# Altium PCB Acoustics Board.PcbDoc (part 1 of 2)
Units mil, origin at the board's own origin, x right, y up, seen from the top; angles counter-clockwise.
Board outline 4000 x 4000 mil, 4 copper layers (Top Layer, Middle 1 Layer, Middle 2 Layer, Bottom Layer), stack 53.912 mil thick; 112 components, 90 nets, 392 pads, 175 vias.
Unrouted connection lines stored in the file: 41.
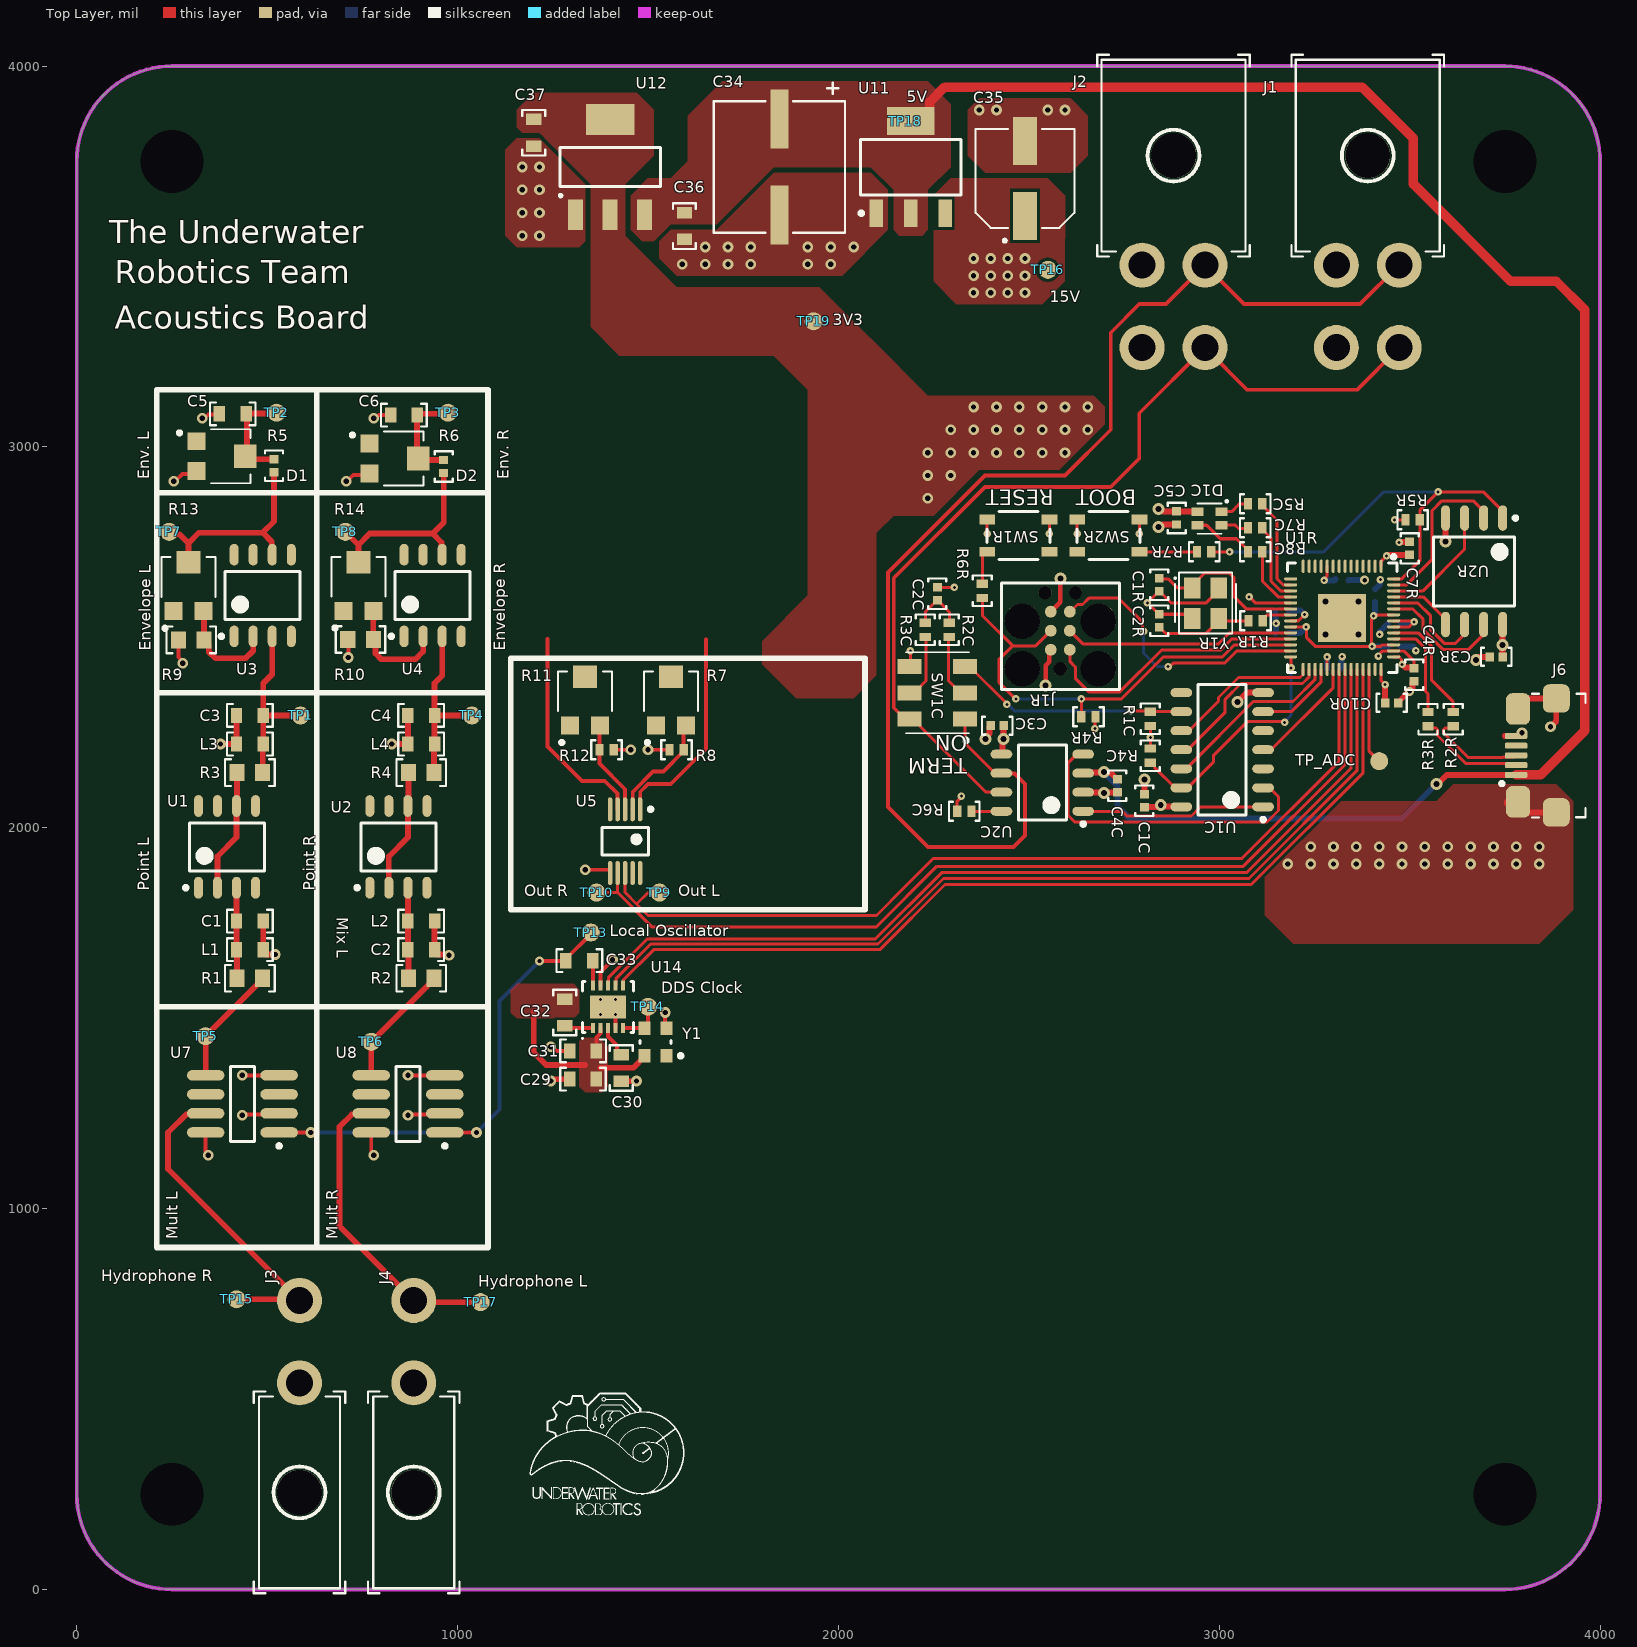
[diagram p0: Top Layer view]
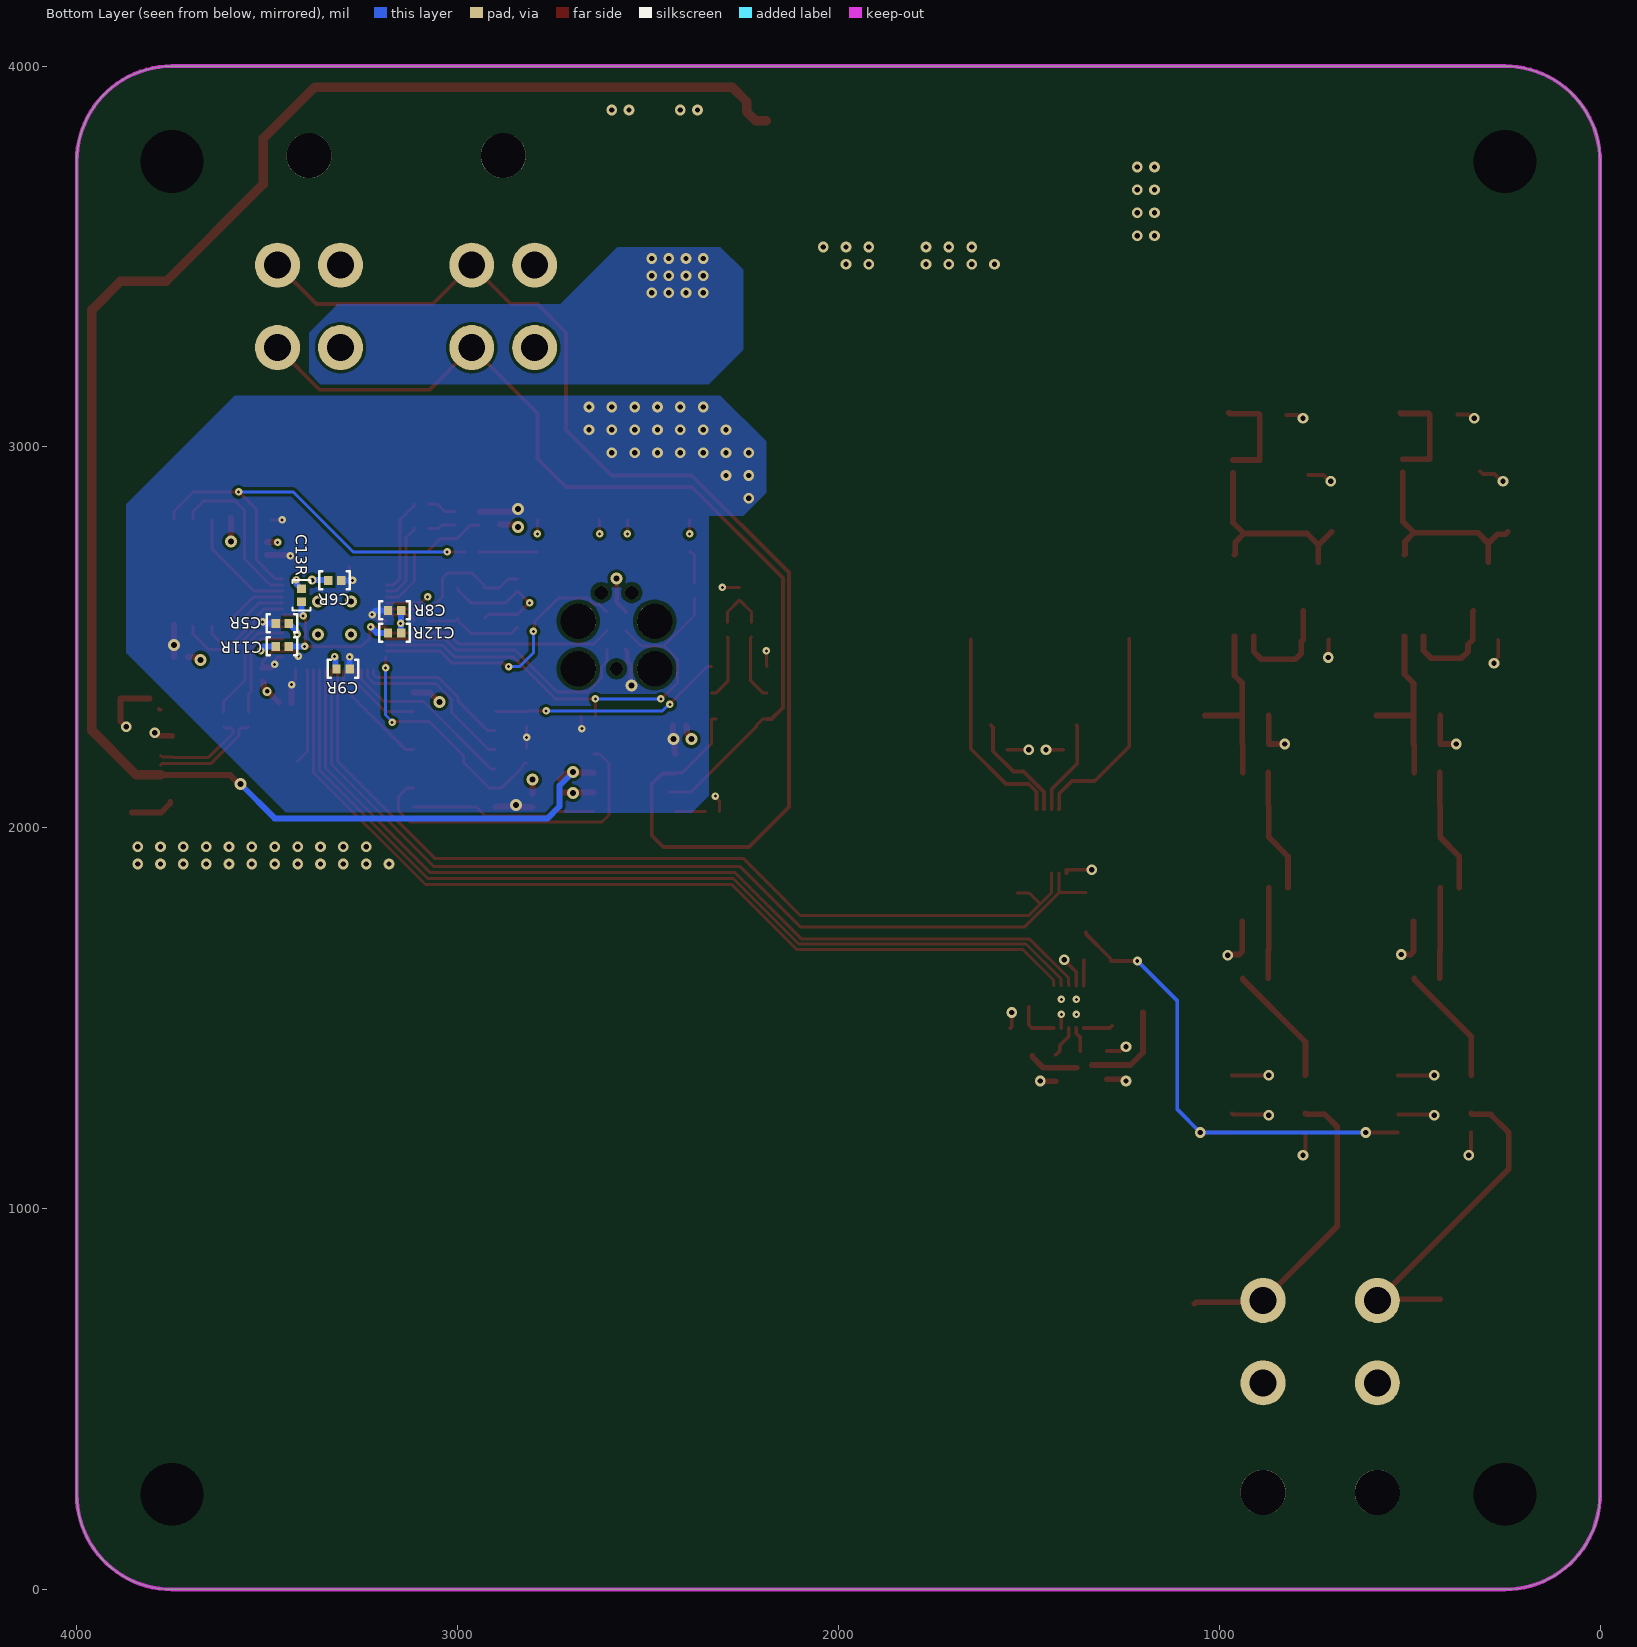
[diagram p1: Bottom Layer view, seen from below]
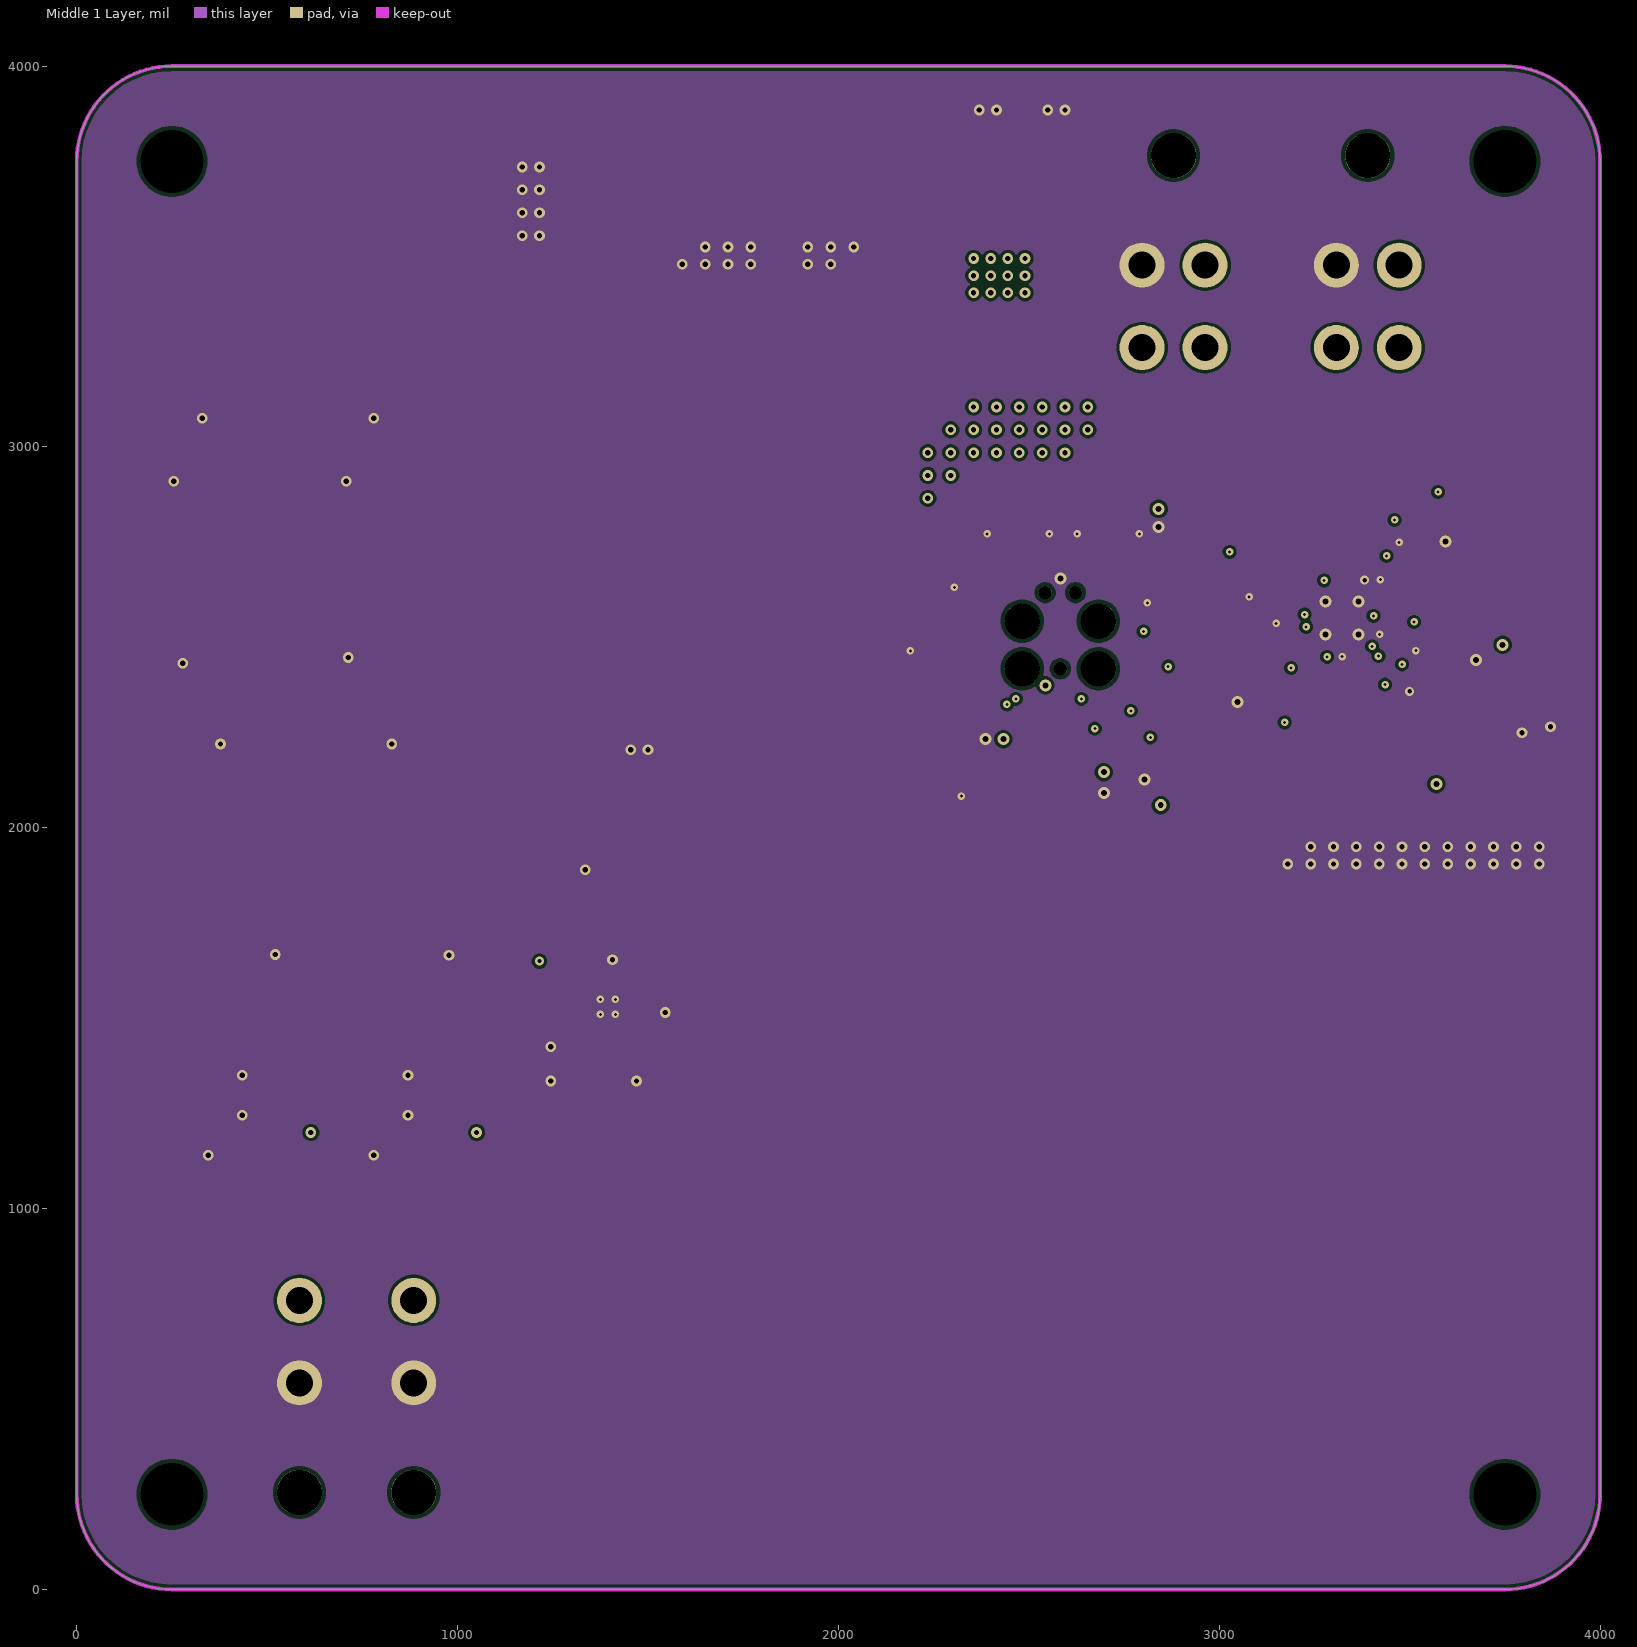
[diagram p2: Middle 1 Layer]
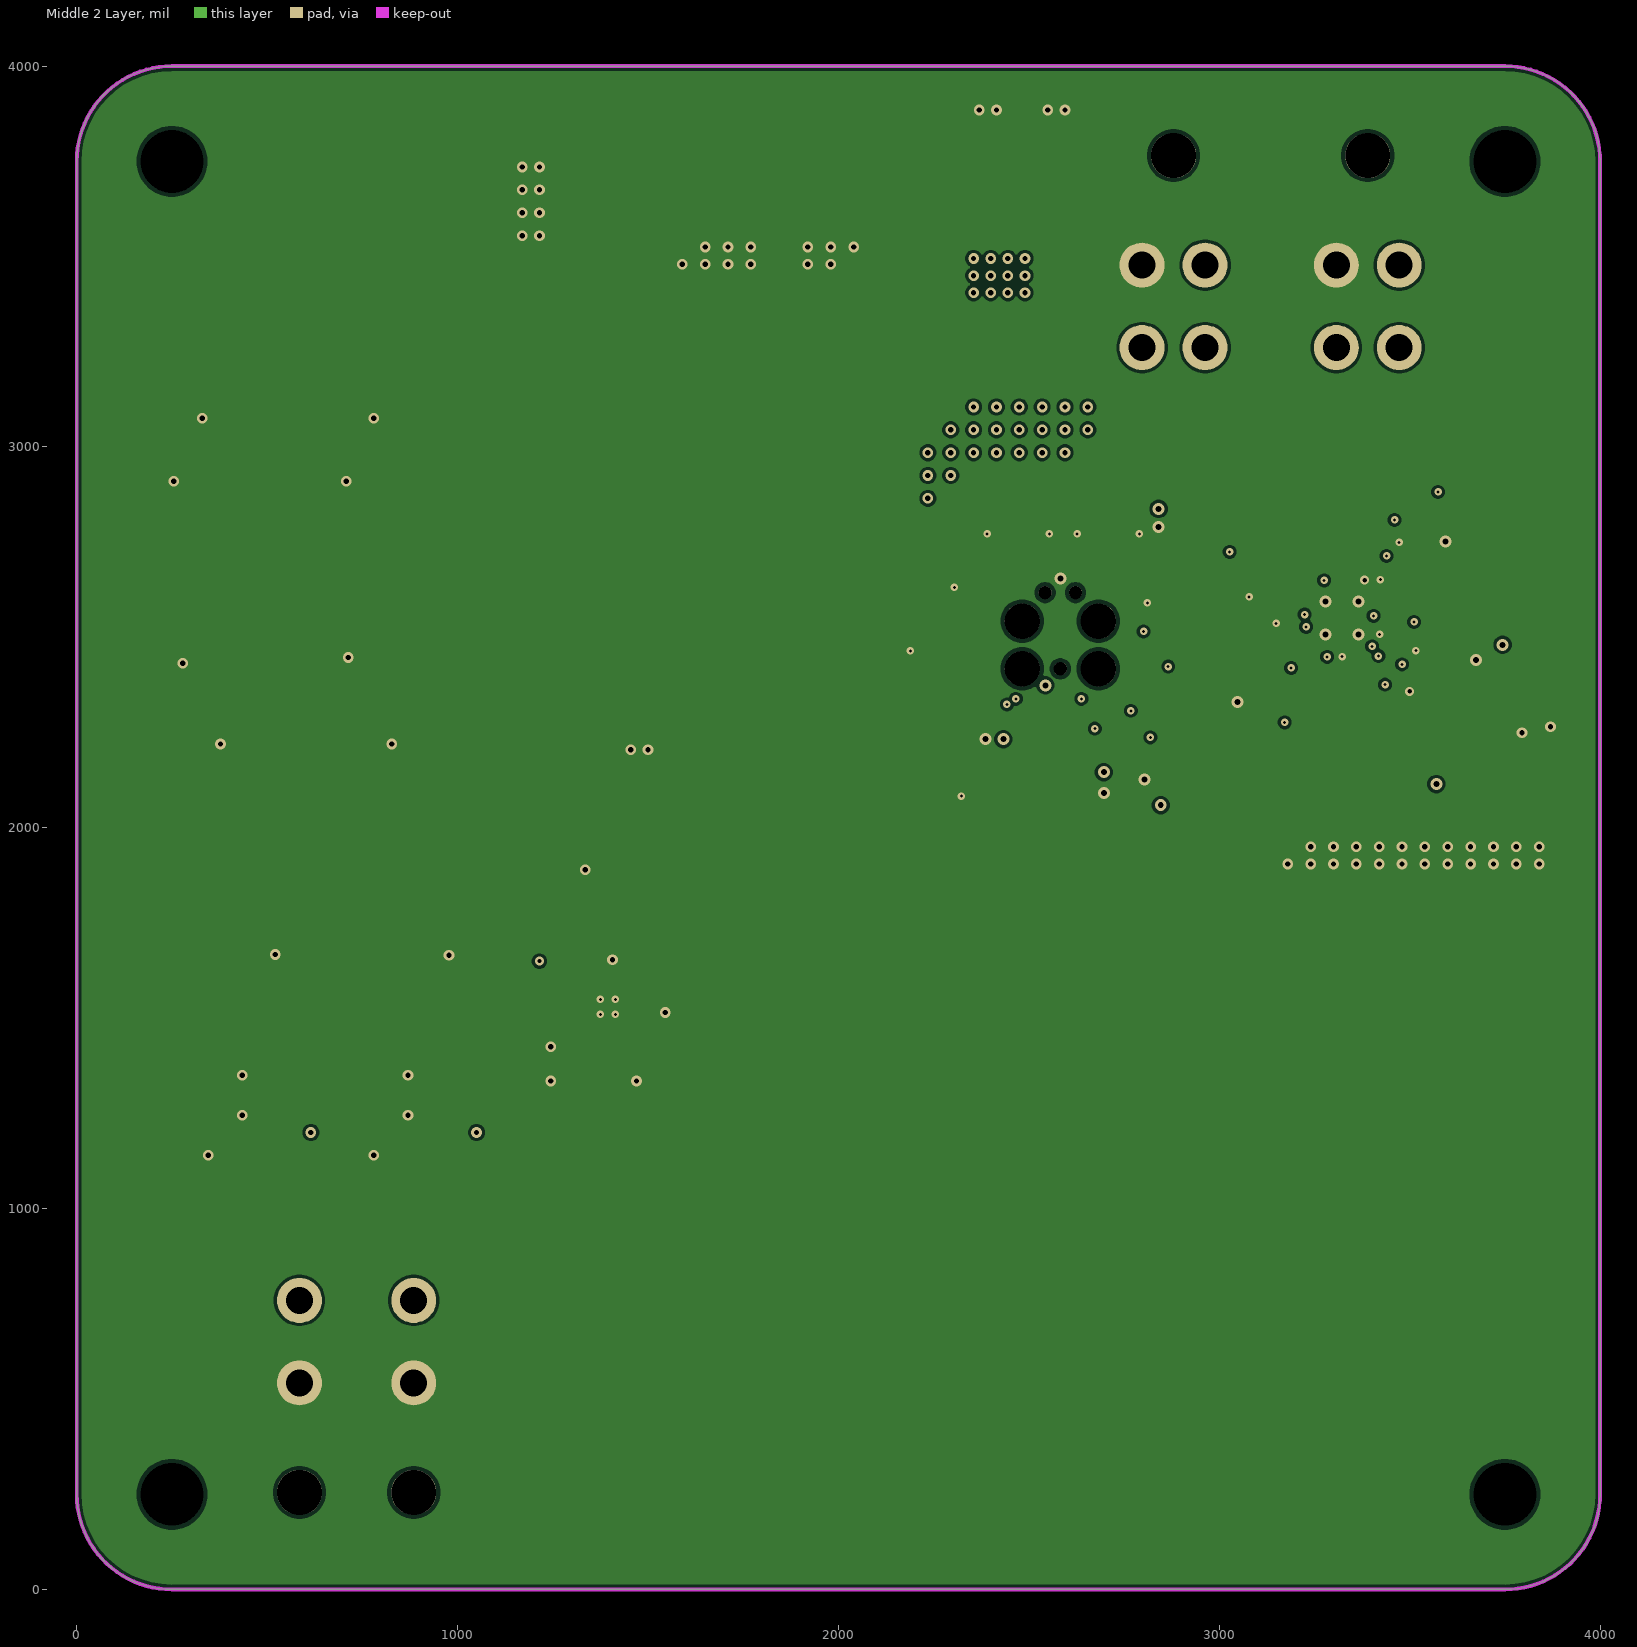
[diagram p3: Middle 2 Layer]
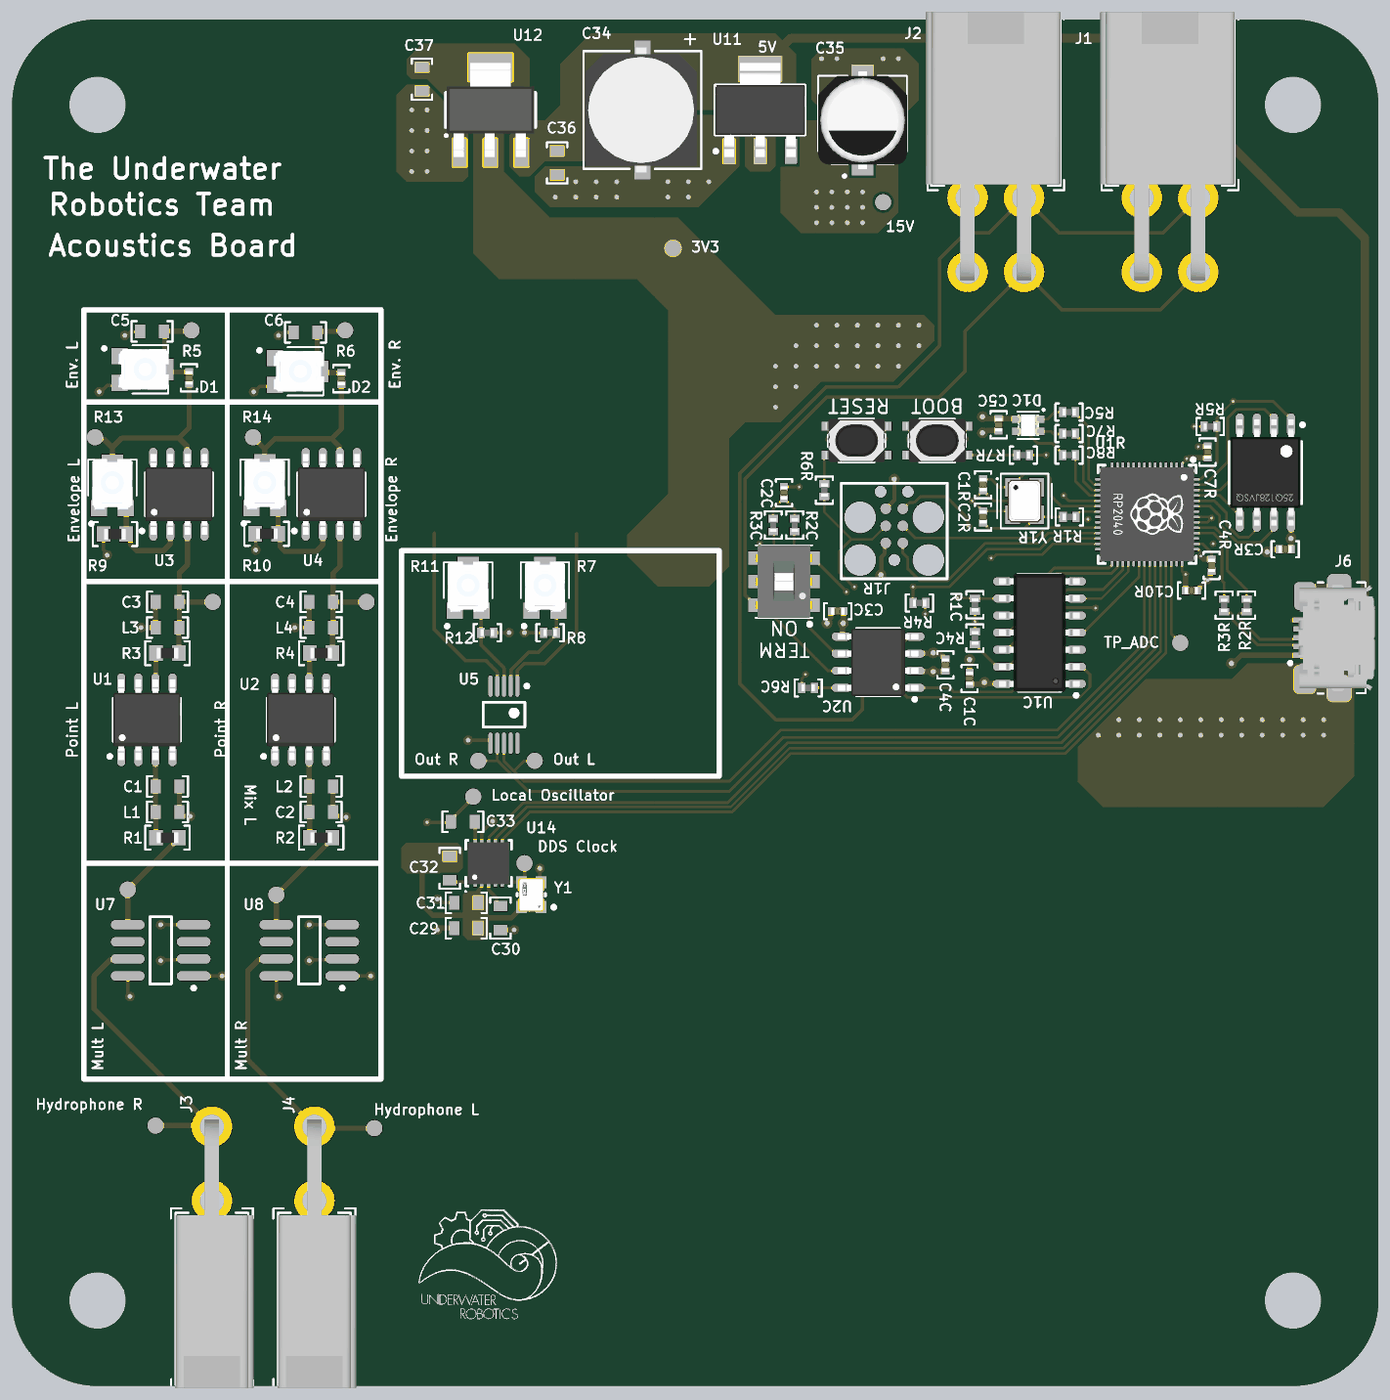
[diagram p5: 3D render of the assembled board from above, using the file's embedded part models]
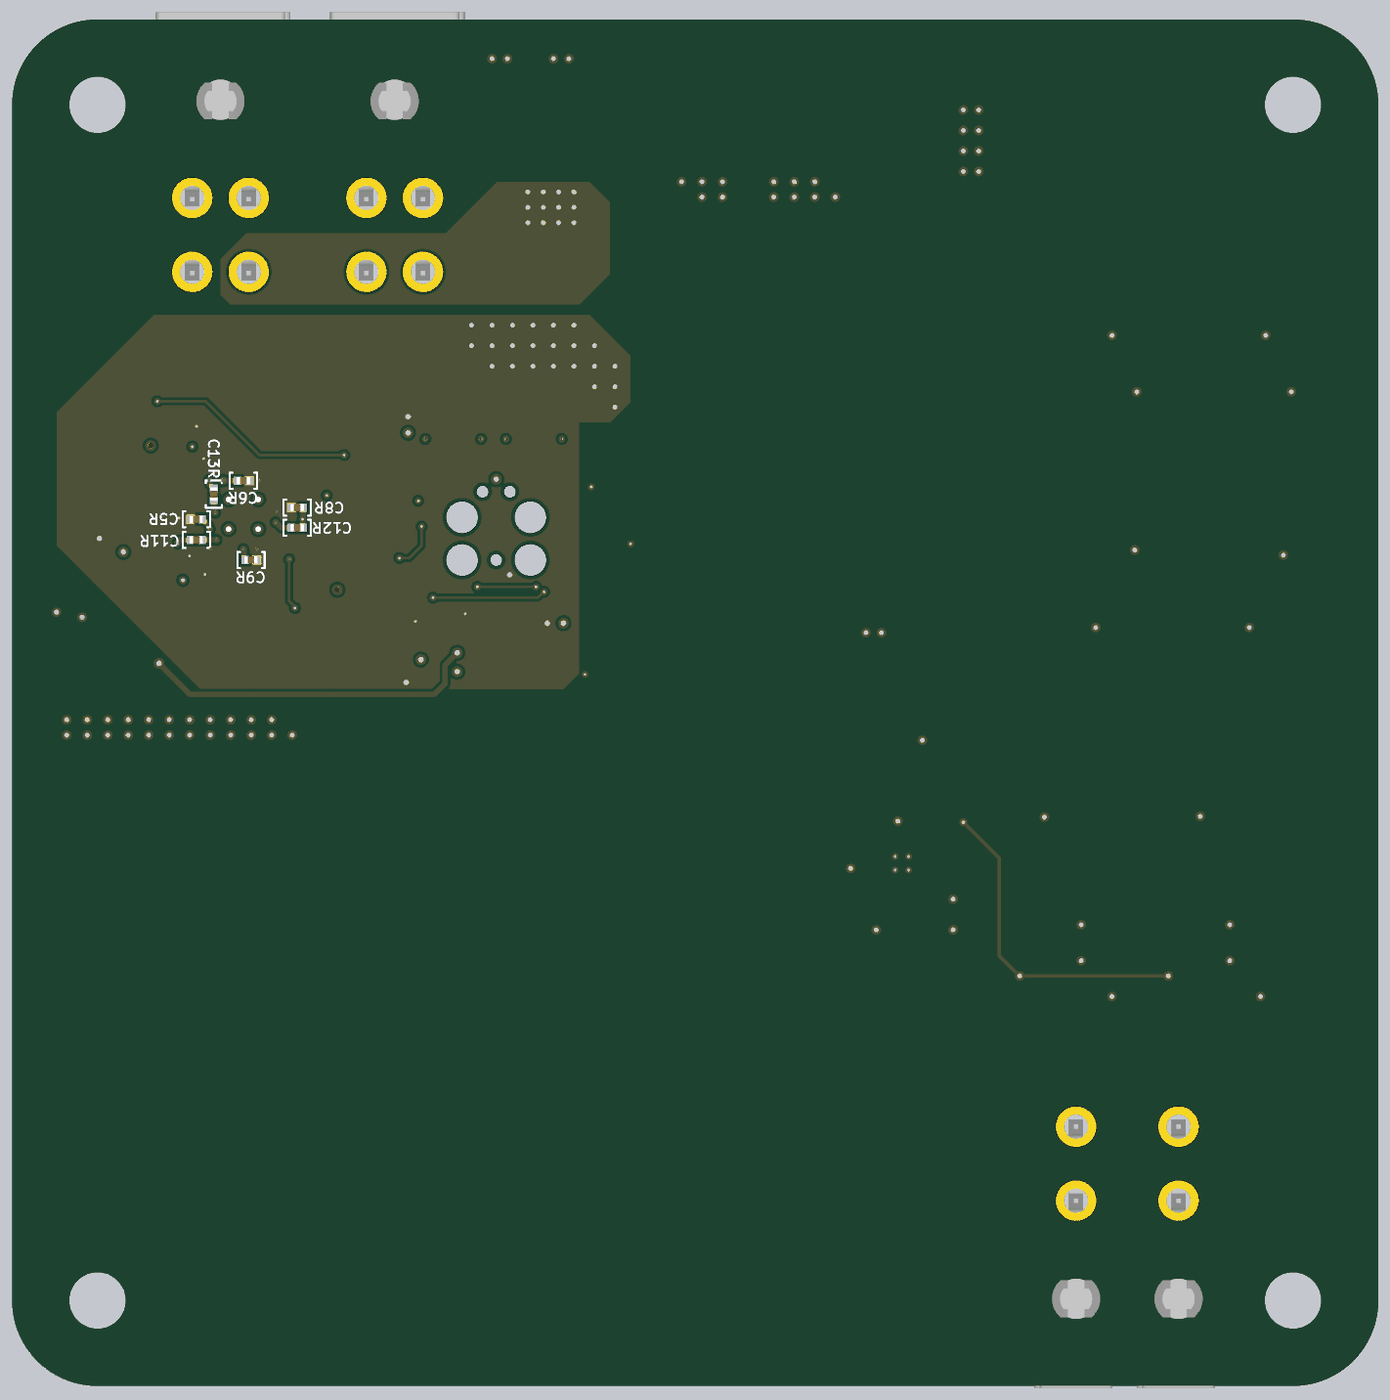
[diagram p6: 3D render of the assembled board from below, using the file's embedded part models]

## Layer stack, top to bottom
Top Solder: solder mask 1, SM-001, Dk 4
Top Layer: signal copper 1.378
Dielectric 1: prepreg 5.1, PP-017, Dk 4.3
Dielectric 2: prepreg 5.1, PP-017, Dk 4.3
Middle 1 Layer: signal copper 1.378
Dielectric 3: core 28, Core-039, Dk 4.8
Middle 2 Layer: signal copper 1.378
Dielectric 4: prepreg 5.1, PP-017, Dk 4.3
Dielectric 5: prepreg 5.1, PP-017, Dk 4.3
Bottom Layer: signal copper 1.378
Bottom Solder: solder mask 1, SM-001, Dk 4

## Board outline
0,250 0,3750 cw(c250,3750) 250,4000 3750,4000 cw(c3750,3750) 4000,3750 4000,250 cw(c3750,250) 3750,0 250,0 cw(c250,250)

## Design rules (kind name [scope] priority, off if disabled: settings)
AcuteAngle [All] p1: minimum=6.00000000000000E+0001 checktracksonly=FALSE
BoardOutlineClearance "BoardOutlineClearance JLCPCB" [All] p1: gap=7.87 ignorepadtopadclearanceinfootprint=FALSE
Clearance "Clearance JLCPCB 4 layer" [All] p1: gap=7.87 ignorepadtopadclearanceinfootprint=FALSE except(3.54: Arc-Arc Arc-Track Track-Track; 5: Arc-SMDPad Track-SMDPad SMDPad-SMDPad; 10: Arc-Hole Track-Hole SMDPad-Hole THPad-Hole Via-Hole Fill-Hole Poly-Hole Region-Hole Text-Hole)
DiffPairsRouting [All] p1: maxlimit=10 minlimit=6 mostfreqgap=8 toplayer_minwidth=3.54 toplayer_maxwidth=15 toplayer_prefwidth=8 midlayer1_minwidth=3.54 midlayer1_maxwidth=15 midlayer1_prefwidth=8 midlayer2_minwidth=3.54 midlayer2_maxwidth=15 midlayer2_prefwidth=8 bottomlayer_minwidth=3.54 bottomlayer_maxwidth=15 bottomlayer_prefwidth=8 maxuncoupledlength=500
HoleSize "HoleSize JLCPCB Pad" [IsPad] p1: absolutevalues=TRUE maxlimit=248.03 minlimit=19.68 maxpercent=80.000 minpercent=20.000
HoleSize "HoleSize JLCPCB 4 layer" [All] p2: absolutevalues=TRUE maxlimit=248.03 minlimit=7.87 maxpercent=80.000 minpercent=20.000
HoleToHoleClearance "HoleToHoleClearance JLCPCB" [All] p1: gap=10 allowstackedmicrovias=TRUE
MinimumAnnularRing "MinimumAnnularRing JLCPCB Pad" [IsPad] p1: minimumring=11.81
MinimumAnnularRing "MinimumAnnularRing JLCPCB 1oz" [All] p2: minimumring=5.12
MinimumSolderMaskSliver [All] p1: minsoldermaskwidth=1
PlaneConnect [All] p1: pad.planeconnectstyle=Relief pad.reliefexpansion=20 pad.reliefentries=4 pad.reliefconductorwidth=10 pad.reliefairgap=10 via.planeconnectstyle=Direct via.reliefexpansion=20 via.reliefentries=4 via.reliefconductorwidth=10 via.reliefairgap=10
PolygonConnect [All] p1: connectstyle=Direct reliefconductorwidth=15 reliefentries=4 polygonreliefangle="45 Angle" airgapwidth=10
RoutingVias "RoutingVias JLCPCB 4 layer" [All] p1: holewidth=19.68 width=39.37 viastyle="Through Hole" minholewidth=7.87 minwidth=15.75 maxholewidth=50 maxwidth=80
SilkToSilkClearance [All] p1: silktosilkclearance=3
SilkToSolderMaskClearance "SilkToSolderMaskClearance JLCPCB" [IsPad] p1: minsilkscreentomaskgap=5.91 clearancetoexposedcopper=TRUE
SolderMaskExpansion "SolderMaskExpansion JLCPCB" [All] p1: expansion=1.97 istentingtop=FALSE
Width "Width JLCPCB 4 layer" [All] p1: maxlimit=196.85 minlimit=3.54 preferedwidth=9.84 minimp=50.000000 maximp=50.000000 favimp=50.000000
23 further rules are at their usual default settings.

## Classes and differential pairs
component class "Process Sheet": C1 C2 C3 C4 C5 C6 D1 D2 L1 L2 L3 L4 R1 R2 R3 R4 R5 R6 R7 R8 R9 R10 R11 R12 R13 R14 TP1 TP2 TP3 TP4 TP5 TP6 TP7 TP8 TP9 TP10 U1 U2 U3 U4 U5 U7 U8
component class "Power Sheet": C34 C35 C36 C37 TP18 TP19 U11 U12
differential pair class "USB 2.0": USB USB_RP2040
component class U_RP2040_C: C1R C2R C3R C4R C5R C6R C7R C8R C9R C10R C11R C12R C13R J1R R1R R2R R3R R4R R5R R6R R7R SW1R SW2R U1R U2R Y1R
component class U_RP2040_with_CAN: C1C C2C C3C C4C C5C D1C R1C R2C R3C R4C R5C R6C R7C R8C SW1C U1C U2C
component class "[Acoustics] Connections & RP2040": C29 C30 C31 C32 C33 J1 J2 J3 J4 J6 TP13 TP14 TP15 TP16 TP17 TP_ADC U14 Y1
differential pair USB: +USB_P -USB_N
differential pair USB_RP2040: +USB_RP2040_P -USB_RP2040_N

## Components (designator, comment, footprint, x,y, rotation, side; value= is the part's Value field where it differs from the comment)
C1 "0.22uF Ceramic 16V" CAPACITOR_0603 454.68,1755 r0 top value=0.22uF
C1C "100nF Ceramic 25V" CAPACITOR_0402 2803.15,2071.14 r90 top value=0.1uF
C1R "27pF Ceramic 50V" CAPACITOR_0402 2842.52,2638.07 r270 top value=27pF
C2 "0.22uF Ceramic 16V" CAPACITOR_0603 904.68,1680 r0 top value=0.22uF
C2C "4700pF Ceramic 25V" CAPACITOR_0402 2259.84,2614.45 r270 top value=4.7nF
C2R "27pF Ceramic 50V" CAPACITOR_0402 2842.52,2543.58 r90 top value=27pF
C3 "0.22uF Ceramic 16V" CAPACITOR_0603 454.68,2295 r180 top value=0.22uF
C3C "100nF Ceramic 25V" CAPACITOR_0402 2417.32,2267.99 r180 top value=0.1uF
C3R "100nF Ceramic 6.3V" CAPACITOR_0402 3727.17,2449.09 r180 top value=0.1uF
C4 "0.22uF Ceramic 16V" CAPACITOR_0603 904.68,2295 r180 top value=0.22uF
C4C "100nF Ceramic 25V" CAPACITOR_0402 2732.28,2110.51 r270 top value=0.1uF
C4R "1uF Ceramic 16V" CAPACITOR_0402 3511.81,2401.85 r270 top value=1uF
C5 "10uF Ceramic 6.3V" CAPACITOR_0603 409.77,3086.93 r180 top
C5C "1uF Ceramic 16V" CAPACITOR_0402 2888.11,2813.59 r270 top value=1uF
C5R "100nF Ceramic 6.3V" CAPACITOR_0402 3460.63,2536.95 r180 bottom value=0.1uF
C6 "10uF Ceramic 6.3V" CAPACITOR_0603 859.24,3083.75 r180 top
C6R "100nF Ceramic 6.3V" CAPACITOR_0402 3322.83,2649.88 r0 bottom value=0.1uF
C7R "100nF Ceramic 6.3V" CAPACITOR_0402 3500,2733.8 r90 top value=0.1uF
C8R "100nF Ceramic 6.3V" CAPACITOR_0402 3165.35,2571.25 r180 bottom value=0.1uF
C9R "100nF Ceramic 6.3V" CAPACITOR_0402 3300.59,2417.6 r0 bottom value=0.1uF
C10R "100nF Ceramic 6.3V" CAPACITOR_0402 3452.76,2328.29 r0 top value=0.1uF
C11R "1uF Ceramic 16V" CAPACITOR_0402 3460.63,2476.65 r0 bottom value=1uF
C12R "100nF Ceramic 6.3V" CAPACITOR_0402 3165.35,2512.09 r180 bottom value=0.1uF
C13R "100nF Ceramic 6.3V" CAPACITOR_0402 3409.45,2610.51 r90 bottom value=0.1uF
C29 "100nF Ceramic 6.3V" CAPACITOR_0603 1329.49,1340.09 r0 top value=0.1uF
C30 "100nF Ceramic 6.3V" CAPACITOR_0603 1429.68,1369.29 r90 top value=0.1uF
C31 "10uF Ceramic 6.3V" CAPACITOR_0603 1329.68,1414.29 r180 top
C32 "CL10B103KB8NNNC" CAPACITOR_0603 1281.42,1515.12 r270 top value=0.01uF
C33 "10uF Ceramic 6.3V" CAPACITOR_0603 1319.67,1651.2 r180 top
C34 "22uF electrolytic 35 V" PCAP_8x5.4-ELECT_NCA 1845,3735 r270 top value=22uF
C35 "10uF electrolytic 63V" CAP_EEHZC1J100P 2490,3705 r90 top value=10uF
C36 "10uF Ceramic 6.3V" CAPACITOR_0603 1595.66,3580 r270 top
C37 "10uF Ceramic 6.3V" CAPACITOR_0603 1199.98,3825.04 r270 top
D1 "BAR9002ELE6327XTMA1" DIODE_0402 518,2950.91 r90 top
D1C "EAST1616RGBB4" LED_0606_4SMD 2974.73,2812.21 r180 top
D2 "BAR9002ELE6327XTMA1" DIODE_0402 963.76,2948.64 r90 top
J1 "Mini-Fit Jr R/A" "CONN_MOLEX_MINIFIT JR_4 POS_R/A" 3390,3765 r180 top
J1R "TagConnect SWD" TC2030-MCP 2582.68,2417.6 r90 top locked
J2 "Mini-Fit Jr R/A" "CONN_MOLEX_MINIFIT JR_4 POS_R/A" 2880,3765 r180 top
J3 "Mini-Fit Jr R/A" "CONN_MOLEX_MINIFIT JR_2 POS_R/A" 585,255 r0 top
J4 "Mini-Fit Jr R/A" "CONN_MOLEX_MINIFIT JR_2 POS_R/A" 885,255 r0 top
J6 "USB_MICRO R/A" CONN_MINIUSB 3885,2190 r90 top
L1 "FIXED IND 12UH 10MA 1.8 OHM SMD" INDUCTOR_0603 454.68,1680 r0 top value=12uH
L2 "FIXED IND 12UH 10MA 1.8 OHM SMD" INDUCTOR_0603 904.68,1755 r0 top value=12uH
L3 "FIXED IND 12UH 10MA 1.8 OHM SMD" INDUCTOR_0603 454.68,2220 r180 top value=12uH
L4 "FIXED IND 12UH 10MA 1.8 OHM SMD" INDUCTOR_0603 904.68,2220 r180 top value=12uH
R1 "1.45k Ohm 0.1% 1/10W" RESISTOR_0603 454.68,1605 r0 top
R1C "10k Ohm 1% 1/16W" RESISTOR_0402 2818.9,2286.3 r90 top
R1R "1k Ohm 1% 1/16W" RESISTOR_0402 3095.55,2543.58 r180 top
R2 "1.45k Ohm 0.1% 1/10W" RESISTOR_0603 904.68,1605 r0 top
R2C "60.4 Ohm 1% 1/16W" RESISTOR_0402 2291.34,2519.96 r90 top
R2R "27 Ohm 1% 1/16W" RESISTOR_0402 3614.33,2285.08 r90 top
R3 "1.45k Ohm 0.1% 1/10W" RESISTOR_0603 454.68,2145 r180 top
R3C "60.4 Ohm 1% 1/16W" RESISTOR_0402 2228.35,2519.96 r90 top
R3R "27 Ohm 1% 1/16W" RESISTOR_0402 3548.32,2285.08 r90 top
R4 "1.45k Ohm 0.1% 1/10W" RESISTOR_0603 904.68,2145 r180 top
R4C "10k Ohm 1% 1/16W" RESISTOR_0402 2818.9,2189.25 r270 top
R4R "10k Ohm 1% 1/16W" RESISTOR_0402 2656.5,2291.61 r180 top
R5 "TC33X-2-203E" TRIM_TC33X-2-203E 385.87,2975.63 r0 top
R5C "604 Ohm 1% 1/16W" RESISTOR_0402 3094.49,2850.67 r180 top
R5R "10k Ohm 1% 1/16W" RESISTOR_0402 3507.87,2808.6 r0 top
R6 "TC33X-2-203E" TRIM_TC33X-2-203E 840,2970 r0 top
R6C "10k Ohm 1% 1/16W" RESISTOR_0402 2330.71,2043.39 r180 top
R6R "1k Ohm 1% 1/16W" RESISTOR_0402 2377.95,2622.32 r270 top
R7 "TC33X-2-203E" TRIM_TC33X-2-203E 1560,2340 r90 top
R7C "200 Ohm 1% 1/16W" RESISTOR_0402 3094.49,2787.68 r180 top
R7R "1k Ohm 1% 1/16W" RESISTOR_0402 2960.63,2724.68 r0 top
R8 "1k Ohm 1% 1/16W" RESISTOR_0402 1575,2205 r180 top
R8C "200 Ohm 1% 1/16W" RESISTOR_0402 3094.49,2724.68 r180 top
R9 "10k Ohm 0.5% 1/10W" RESISTOR_0603 300.85,2493.51 r180 top
R10 "10k Ohm 0.5% 1/10W" RESISTOR_0603 745.52,2494.37 r180 top
R11 "TC33X-2-203E" TRIM_TC33X-2-203E 1335,2340 r90 top
R12 "1k Ohm 1% 1/16W" RESISTOR_0402 1391.3,2205 r0 top
R13 "TC33X-2-103E" TRIM_TC33X-2-203E 293.38,2640 r90 top
R14 "TC33X-2-103E" TRIM_TC33X-2-203E 739.68,2640.63 r90 top
SW1C "Switch DPDT" CAS-220TA 2259.84,2354.61 r90 top
SW1R "434123025826" SMD_434123025826 2472.44,2767.01 r180 top
SW2R "434123025826" SMD_434123025826 2708.66,2767.01 r180 top
TP1 "PCB Test Point" TESTPOINT_1.2MM 587.68,2295 r0 top
TP2 "PCB Test Point" TESTPOINT_1.2MM 525,3090 r180 top
TP3 "PCB Test Point" TESTPOINT_1.2MM 975,3090 r180 top
TP4 "PCB Test Point" TESTPOINT_1.2MM 1037.68,2295 r0 top
TP5 "PCB Test Point" TESTPOINT_1.2MM 338.54,1452.86 r0 top
TP6 "PCB Test Point" TESTPOINT_1.2MM 773.54,1437.86 r0 top
TP7 "PCB Test Point" TESTPOINT_1.2MM 242.77,2777 r180 top
TP8 "PCB Test Point" TESTPOINT_1.2MM 705.4,2777 r180 top
TP9 "PCB Test Point" TESTPOINT_1.2MM 1530,1830 r0 top
TP10 "PCB Test Point" TESTPOINT_1.2MM 1365,1830 r90 top
TP13 "PCB Test Point" TESTPOINT_1.2MM 1350,1725 r90 top
TP14 "PCB Test Point" TESTPOINT_1.2MM 1500,1530 r90 top
TP15 "PCB Test Point" TESTPOINT_1.2MM 420,761.97 r90 top
TP16 "PCB Test Point" TESTPOINT_1.2MM 2550,3465 r90 top
TP17 "PCB Test Point" TESTPOINT_1.2MM 1060.53,754.47 r90 top
TP18 "PCB Test Point" TESTPOINT_1.2MM 2175,3855 r90 top
TP19 "PCB Test Point" TESTPOINT_1.2MM 1935,3330 r90 top
TP_ADC "PCB Test Point" TESTPOINT_1.2MM 3420,2175 r90 top
U1 "LM356MX/NOPB" SOIC-8 394.68,1950 r90 top
U1C "MCP2517FD" SOIC-14 3007.87,2205 r180 top
U1R "RP2040" "QFN-56 RP2040" 3322.83,2551.46 r270 top
U2 "LM356MX/NOPB" SOIC-8 844.68,1950 r90 top
U2C "CAN Transceiver" SOIC-8 2535.43,2118.39 r180 top
U2R "W25Q128JVSIQ" "SOIC-8 W25QxJV" 3669.29,2673.56 r270 top
U3 "LM356MX/NOPB" SOIC-8 488.38,2610 r90 top
U4 "LM356MX/NOPB" SOIC-8 934.68,2610 r90 top
U5 "LT1715CMS#PBF" LT-MS10_N 1440,1965 r270 top
U7 "AD633JRZ" ADI-R-8_M 435,1275 r180 top
U8 "AD633JRZ" ADI-R-8_M 870,1275 r180 top
U11 "AZ1117IH-5.0TRG1" SOT223-3 2190,3735 r90 top
U12 "LM1117IMPX-3.3/NOPB" SOT-223-4 1400.66,3735 r90 top
U14 "IC DDS 5MHZ 10BIT 10LFCSP" CP-10-9 1395,1530 r90 top
Y1 "ECS-TXO-2520-33-250-AN-TR" FP-ECS-TXO-2520-MFG 1519.79,1437.78 r90 top
Y1R "CRYSTAL 12.0000MHZ 18PF SMD" "4-SMD, NO LEAD CRYSTAL 3.2x2.5mm" 2929.13,2630.2 r270 top

## Footprints (in the part's own frame and the unit in brackets; to place one, negate y for a bottom-side part, rotate by r counter-clockwise, add the part's x,y. Pads: shape width x height; smd on the part's side, far side on the other; paste and mask are expansions set on the pad)
"4-SMD, NO LEAD CRYSTAL 3.2x2.5mm" [mm]
  rrect0% 1.4x1.1 smd: 1(0,0) 2(2.032,0) 3(2.032,1.778) 4(0,1.778)
  silkscreen extent -1.02,-1.2 3.05,2.92, body extent -0.58,-0.36 2.62,2.14, height 0.82
ADI-R-8_M [mm] "SOIC, 8-Leads, Body 5x4mm, Pitch 1.27mm, IPC Low Density"
  oval 2.5x0.7 smd: 1(-2.45,1.905) 2(-2.45,0.635) 3(-2.45,-0.635) 4(-2.45,-1.905) 5(2.45,-1.905) 6(2.45,-0.635) 7(2.45,0.635) 8(2.45,1.905)
  silkscreen extent -2.58,-2.5 0.8,2.93, body extent -2,-2.5 2,2.5, height 1.75
CAP_EEHZC1J100P [mm]
  rect 3.2x1.6 smd: 1(-2.5,0) 2(2.5,0)
  silkscreen extent -4.25,-3.3 3.3,3.3, body extent -3.65,-3.3 3.65,3.3, height 5.8
CAPACITOR_0402 [mm]
  rect 0.56x0.6 smd: 1(-0.435,0) 2(0.435,0)
  silkscreen extent -1.02,-0.6 1.02,0.6, body extent -0.5,-0.28 0.5,0.27, height 0.51
CAPACITOR_0603 [mil] "CAPACITOR 0603"
  rect 30x40 smd: 1(-35,0) 2(35,0)
  silkscreen extent -60,-30 60,30, body extent -31,-16 32,16, height 31
CAS-220TA [mm] "SWITCH SLIDE DPDT 100MA 6V"
  rrect0% 1x1.6 smd: 1(-1.75,-1.85) 2(0,-1.85) 3(1.75,-1.85) 4(-1.75,1.85) 5(0,1.85) 6(1.75,1.85)
  silkscreen extent -3.3,-2.1 2.7,2.1, body extent -2.7,-2.1 2.7,2.1, height 2.51
CONN_MINIUSB [mm] "USB2.0 Micro-B Receptacle SMD R/A"
  rrect50% 0.4x1.5 smd: 1(-1.3,2.675) 2(-0.65,2.675) 3(0,2.675) 4(0.65,2.675) 5(1.3,2.675)
  rrect50% 2.1x1.6 smd: 6(-3.1,2.55) 7(3.1,2.55)
  rrect50% 1.9x1.8 smd: 8(3.8,0) 9(-3.8,0)
  silkscreen extent -4.14,-1.96 4.11,3.75, body extent -3.96,-2.67 3.96,2.99, height 2.72
"CONN_MOLEX_MINIFIT JR_2 POS_R/A" [mm] "Molex Minifit Jr 5569 2 Pos R/A"
  round 3 hole 1.8: 1(0,7.3) 2(0,12.8)
  round 3 hole 3 unplated mask+0: ""(0,0)
  silkscreen extent -3.05,-6.73 3.05,6.73, body extent -2.7,-6.6 3.1,13.34, height 11.4
"CONN_MOLEX_MINIFIT JR_4 POS_R/A" [mm] "Molex Minifit Jr 5569 4 Pos R/A"
  round 3 hole 1.8: 1(2.1,7.3) 2(-2.1,7.3) 3(2.1,12.8) 4(-2.1,12.8)
  round 3 hole 3 unplated mask+0: ""(0,0)
  silkscreen extent -5.08,-6.73 5.08,6.73, body extent -4.8,-6.5 5.2,13.44, height 11.4
CP-10-9 [mm]
  rect 0.68x0.25 smd: 1(-1.415,1) 2(-1.415,0.5) 3(-1.415,0) 4(-1.415,-0.5) 5(-1.415,-1) 6(1.415,-1) 7(1.415,-0.5) 8(1.415,0) 9(1.415,0.5) 10(1.415,1)
  rect 1.53x2.38 smd: 11(0,0)
  silkscreen extent -2.15,-1.7 1.7,1.75, body extent -1.57,-1.55 1.57,1.55, height 0.8
DIODE_0402 [mm]
  rect 0.56x0.6 smd: 1(-0.435,0) 2(0.435,0)
  silkscreen extent -1.02,-0.6 1.02,0.6, body extent -0.5,-0.28 0.5,0.27, height 0.51
FP-ECS-TXO-2520-MFG [mm]
  rect 0.9x0.8 smd paste+0 mask+0: 1(-0.925,-0.725) 2(0.925,-0.725) 3(0.925,0.725) 4(-0.925,0.725)
  silkscreen extent -1.05,-1.8 0.1,1.05, body extent -1.48,-1.22 1.48,1.22, height 0.25
INDUCTOR_0603 [mil] "INDUCTOR 0603"
  rect 30x40 smd: 1(-35,0) 2(35,0)
  silkscreen extent -60,-30 60,30, body extent -31,-16 32,16, height 31
LED_0606_4SMD [mm]
  rrect0% 0.8x0.55 smd: 1(-0.8,-0.45) 2(-0.8,0.45) 3(0.8,0.45) 4(0.8,-0.45)
  silkscreen extent -1.22,-1.22 0.8,1.02, body extent -0.8,-0.8 0.8,0.8, height 0.35
LT-MS10_N [mm] "SOP, 10-Leads, Body 3x3mm, Pitch 0.5mm, IPC Medium Density"
  oval 1.6x0.3 smd: 1(-2.125,1) 2(-2.125,0.5) 3(-2.125,0) 4(-2.125,-0.5) 5(-2.125,-1) 6(2.125,-1) 7(2.125,-0.5) 8(2.125,0) 9(2.125,0.5) 10(2.125,1)
  silkscreen extent -2.25,-1.55 0.92,1.83, body extent -1.55,-1.55 1.55,1.55, height 1.1
PCAP_8x5.4-ELECT_NCA [mil]
  rect 154x47 smd paste+0 mask+0: 1(-126,0) 2(126,0)
  silkscreen extent -222,-173 173,173, body extent -183,-167 183,160, height 219
"QFN-56 RP2040" [mm] "QFN, 56-Leads, Body 7.00x7.00mm, Pitch 0.40mm, Thermal Pad 3.10x3.10mm, IPC Medium Density"
  oval 0.875x0.2 smd: 1(-3.437,2.6) 2(-3.437,2.2) 3(-3.437,1.8) 4(-3.437,1.4) 5(-3.437,1) 6(-3.437,0.6) 7(-3.437,0.2) 8(-3.437,-0.2) 9(-3.437,-0.6) 10(-3.437,-1) 11(-3.437,-1.4) 12(-3.437,-1.8) 13(-3.437,-2.2) 14(-3.437,-2.6) 29(3.437,-2.6) 30(3.437,-2.2) 31(3.437,-1.8) 32(3.437,-1.4) 33(3.437,-1) 34(3.437,-0.6) 35(3.437,-0.2) 36(3.437,0.2) 37(3.437,0.6) 38(3.437,1) 39(3.437,1.4) 40(3.437,1.8) 41(3.437,2.2) 42(3.437,2.6)
  oval 0.2x0.875 smd: 15(-2.6,-3.437) 16(-2.2,-3.437) 17(-1.8,-3.437) 18(-1.4,-3.437) 19(-1,-3.437) 20(-0.6,-3.437) 21(-0.2,-3.437) 22(0.2,-3.437) 23(0.6,-3.437) 24(1,-3.437) 25(1.4,-3.437) 26(1.8,-3.437) 27(2.2,-3.437) 28(2.6,-3.437) 43(2.6,3.437) 44(2.2,3.437) 45(1.8,3.437) 46(1.4,3.437) 47(1,3.437) 48(0.6,3.437) 49(0.2,3.437) 50(-0.2,3.437) 51(-0.6,3.437) 52(-1,3.437) 53(-1.4,3.437) 54(-1.8,3.437) 55(-2.2,3.437) 56(-2.6,3.437)
  rect 3.2x3.2 smd: 57(0,0)
  silkscreen extent -4.19,-3.65 3.65,3.65, body extent -3.52,-3.52 3.52,3.52, height 0.85
RESISTOR_0402 [mm] "Resistor 0402"
  rect 0.55x0.75 smd: 1(-0.475,0) 2(0.475,0)
  silkscreen extent -1.02,-0.64 1.02,0.64, body extent -0.5,-0.25 0.5,0.25, height 0.25
RESISTOR_0603 [mil] "Resistor 0603"
  rect 40x45 smd: 1(-33.5,0) 2(33.5,0)
  silkscreen extent -65,-35 65,35, body extent -31,-16 32,16, height 16
SMD_434123025826 [mm]
  rect 1.05x0.65 smd: A1(-2.075,1.075) A2(2.075,1.075) B1(-2.075,-1.075) B2(2.075,-1.075)
  silkscreen extent -2.1,-1.6 2.1,1.6, body extent -2.3,-1.6 2.3,1.6, height 2.5
SOIC-8 [mm] "SOIC, 8-Leads, Body 4.90x3.90mm, Pitch 1.27mm, IPC Medium Density"
  oval 1.45x0.6 smd: 1(-2.725,1.905) 2(-2.725,0.635) 3(-2.725,-0.635) 4(-2.725,-1.905) 5(2.725,-1.905) 6(2.725,-0.635) 7(2.725,0.635) 8(2.725,1.905)
  silkscreen extent -2.85,-2.5 1.6,2.88, body extent -3,-2.5 3,2.5, height 1.75
"SOIC-8 W25QxJV" [mm] "SOIC, 8-Leads, Body 5.28x5.28mm, Pitch 1.27mm, IPC Medium Density"
  oval 1.7x0.6 smd: 1(-3.55,1.905) 2(-3.55,0.635) 3(-3.55,-0.635) 4(-3.55,-1.905) 5(3.55,-1.905) 6(3.55,-0.635) 7(3.55,0.635) 8(3.55,1.905)
  silkscreen extent -3.67,-2.7 2.3,2.88, body extent -3.95,-2.62 3.95,2.62, height 1.95
SOIC-14 [mm] "SOIC, 14-Leads, Body 8.65x3.90mm, Pitch 1.27mm, IPC Medium Density"
  oval 1.45x0.6 smd: 1(-2.725,3.81) 2(-2.725,2.54) 3(-2.725,1.27) 4(-2.725,0) 5(-2.725,-1.27) 6(-2.725,-2.54) 7(-2.725,-3.81) 8(2.725,-3.81) 9(2.725,-2.54) 10(2.725,-1.27) 11(2.725,0) 12(2.725,1.27) 13(2.725,2.54) 14(2.725,3.81)
  silkscreen extent -2.85,-4.35 1.6,4.78, body extent -3,-4.4 3,4.4, height 1.7
SOT223-3 [mm] "SOT223, 4-Leads, Body 6.50x7.00mm (avg), Pitch 2.30mm, IPC Medium Density"
  rect 1.85x0.9 smd: 1(-3.075,2.3) 2(-3.075,0) 3(-3.075,-2.3)
  rect 1.85x3.2 smd: 2(3.075,0)
  silkscreen extent -3.2,-3.35 1.85,3.42, body extent -3.5,-3.35 3.5,3.35, height 1.8
SOT-223-4 [mm]
  rect 2.05x1 smd paste+0 mask+0.102: 1(-3.175,2.3) 2(-3.175,0) 3(-3.175,-2.3)
  rect 2.05x3.25 smd paste+0 mask+0.102: 4(3.175,0)
  silkscreen extent -1.96,-3.35 1.3,3.35, body extent -3.5,-3.25 3.5,3.25, height 1.68
TC2030-MCP [mil]
  round 31 smd: 1(50,-25) 2(50,25) 3(100,-25) 4(100,25) 5(150,-25) 6(150,25)
  round 34 hole 35 unplated: A(0,0) B(200,40) C(200,-40)
  round 92 hole 93 unplated: D(0,-100) E(125,-100) F(0,100) G(125,100)
  silkscreen extent -55,-155 225,155
TESTPOINT_1.2MM [mm]
  round 1.2 smd: TP(0,0)
TRIM_TC33X-2-203E [mm]
  rect 1.2x1.2 smd: 1(-1.8,1) 3(-1.8,-1)
  rect 1.5x1.6 smd: 2(1.45,0)
  silkscreen extent -3.07,-1.8 1.8,1.8, body extent -1.9,-1.5 1.9,1.5, height 1.1

## Part data
C1 C2 C3 C4: library part CAPACITOR_0.000027uF_0603, "CAP CER 0.22uF 16V X7R 0603", Tolerance="+/- 5%", Voltage=16V, ComponentLink2Description=Digikey, ComponentLink2URL=https://www.digikey.com/en/products/detail/yageo/CC0603JRX7R7BB224/5883645, Made By="Nathan Ayer"
C1C C3C C3R C4C C5R C6R C7R C8R C9R C10R C12R C13R: library part CAPACITOR_0.1uF_0402, "Cap 100nF 25V +/-10% / Ceramic 0402", Supplier Part Number 1=478-7868-1-ND, Tolerance="+/- 10%", Voltage=25V, Made By="Robert Pafford", Supplier 1=Digi-Key
C1R C2R: library part CAPACITOR_0.000027uF_0402, "Cap 27pF 50V +/-5% / Ceramic 0402", Supplier Part Number 1=445-5589-1-ND, Tolerance="+/- 5%", Voltage=50V, Made By="Robert Pafford", Supplier 1=Digi-Key
C2C: library part CAPACITOR_0.0047uF_0402, "4700 pF +/-10% 25V Ceramic Capacitor X7R 0402", Supplier Part Number 1=478-6195-1-ND, Tolerance="+/- 10%", Voltage=25V, Made By="Robert Pafford", Supplier 1=Digi-Key
C4R C5C C11R: library part CAPACITOR_1uF_0402, "Cap 1uF 16V +/-10% / Ceramic 0402", Supplier Part Number 1=478-0402YD105KAT4ADKR-ND, Tolerance="+/- 10%", Voltage=16V, Made By="Robert Pafford", Supplier 1=Digi-Key
C5 C6 C31 C33 C36 C37: library part CAPACITOR_10uF_0603, "Cap 10uF 6.3V +/-20% / Ceramic 0603", Supplier Part Number 1=1276-1119-1-ND, Tolerance="+/- 20%", Value (uF)="10 uF", Voltage=6.3V, ComponentLink1Description=Digikey, ComponentLink1URL=https://www.digikey.com/en/products/detail/samsung-electro-mechanics/CL10A106MQ8NNNC/3886777, Made By="Flip B", Supplier 1=Digi-Key
C29 C30: library part CAPACITOR_0.1uF_0603, "Cap 100nF 6.3V +/-10% / Ceramic 0603", Supplier Part Number 1=399-15351-1-ND, Tolerance="+/- 10%", Voltage=6.3V, ComponentLink1Description=Datsheet, ComponentLink1URL=https://www.mouser.com/datasheet/2/212/KEM_C1002_X7R_SMD-1102033.pdf, Made By="Flip B", Supplier 1=Digi-Key
C32: library part CAPACITOR_0.01uF_0603_50V, "10000 pF ±10% 50V Ceramic Capacitor X7R 0603 (1608 Metric)", Tolerance="+/- 10%", Voltage=6.3V, ComponentLink1Description=Datsheet, ComponentLink1URL=https://www.mouser.com/datasheet/2/212/KEM_C1002_X7R_SMD-1102033.pdf, Made By="Flip B", Supplier 1="Arrow Electronics", Supplier Part Number 1=CL10B103KB8NNNC
C34: library part "CAP ALUM 22UF 20% 35V SMD", "22 µF 35 V Aluminum Electrolytic Capacitors Radial, Can - SMD 1000 Hrs", Supplier Part Number 1=PCE3952DKR-ND, Voltage=35V, Made By="Robert Pafford", Supplier 1=Digi-Key
C35: library part "CAP ALUM 10UF 20% 63V SMD", "10 µF 63 V Aluminum - Polymer Capacitors Radial, Can SMD 120mOhm", Max Voltage=63V, Supplier Part Number 1=P15466CT-ND, Tolerance="+/- 20%", Made By="Robert Pafford", Supplier 1=Digi-Key
D1 D2: library part "RF Diode 80V 100mA", "RF Diode PIN - Single 80V 100 mA 250 mW PG-TSLP-2-19", Forward Current=100mA, Package=0402, Voltage - Peak Reverse=80V
D1C: library part LED_RGB_4SMD, "LED RGB CLEAR 4SMD", Blue Forward Current=5mA, Blue Forward Voltage=2.8V, Color=RGB, Package=4-SMD, Red Forward Voltage=1.8V, Supplier Part Number 1=1080-1552-1-ND, ComponentLink1Description=Datasheet, ComponentLink1URL=https://everlightamericas.com/index.php?controller=attachment&id_attachment=3220, Green Forward Current=5mA, Green Forward Voltage=2.8V, Made By="Robert Pafford", Red Forward Current=5mA, Supplier 1=Digi-Key
J1 J2: library part "CONN_MOLEX_MINIFIT JR_4POS_R/A", "Molex Minifit Jr. 5569  / 4 Pos R/A Natural", Color=Natural, Current Per Pin=13A, Manufacturer=Molex, Supplier Part Number 1=WM13112-ND, ComponentLink1Description=Datasheet, ComponentLink1URL=https://www.molex.com/pdm_docs/sd/026013115_sd.pdf, Configuration="Right Angle", Created By="Flip B", Number of Positions=4, Pitch=4.2mm, Series="Minifit Jr 5569", Supplier 1=Digi-Key
J1R: library part TC2030_SWD, "TagConnect TC2030 ARM SWD 6-pin"
J3 J4: library part "CONN_MOLEX_MINIFIT JR_2POS_R/A", "Molex Minifit Jr. 5569  / 2 Pos R/A Natural", Color=Natural, Current Per Pin=13A, Manufacturer=Molex, Supplier Part Number 1=WM1351-ND, ComponentLink1Description=Datasheet, ComponentLink1URL=https://www.molex.com/pdm_docs/sd/026013115_sd.pdf, Configuration="Right Angle", Created By="Robert P", Number of Positions=2, Pitch=4.2mm, Series="Minifit Jr 5569", Supplier 1=Digi-Key
J6: library part CONN_MICROUSB, "Amphenol Micro USB-B / USB2.0 5 Pin Right Angle SMD", Color=Silver, Current Per Pin=1.8A, Manufacturer=Amphenol, Supplier Part Number 1=609-4613-1-ND, ComponentLink1Description=Datasheet, ComponentLink1URL=https://cdn.amphenol-icc.com/media/wysiwyg/files/documentation/datasheet/inputoutput/io_usb_micro.pdf?__cf_chl_jschl_tk__=05693735e19256298f6ef6ca2bb2e65c376a4f56-1625503833-0-Abitsb0-ufjOXJYs_S3J3r2iTn-nObalbmXUksF1VvO_h_WEmRdMlUD1I8-hmWSEVWzY1pirKnrPZWfgY3851qyBZe5ZvnNQePLGIzUgdEIQBVUyW36RsbYpDLEWxJ4horD-5gChFgobLYqwmG5aHl0E8lIn_twwPPrOxilK2gP0q9t_CNOs_u5fMqXvXUrlsOv8tIE2NRlu6NVP8qtkL2GjhlkeTUbDMF8WvvpPDTFOgvZ4Y16Ej8F8AhWos88mo5B1HssXozw0XrkJQIqERITUu6rqloz9kf4ZzhBHtDAt-IkiAFY_Ds9SW8FYKKTtINJVpHZQ6Gyu1FFM4Dc9MO0maE8_mmNcwlxqyRoRk_MPWW8VyByXWM5RSp52jteRKw7FeI9WIYvCbPAOy0Eyib-aseIQsnGbglBcUY6_2xp8GYaJM38H3dNvBPsSOfJBPndKedwKHllxjkucXn6xsN0sDXkpGN-cu8_2bDTJ0g-uUucKSCooYX-ApSDNGpkA_p9zv1SOAD8c0zaZVmtiBsN75QpVz2rzq9_BFxOywPvR, Configuration="Right Angle", Created By="Flip B", Number of Positions=5, Pitch=0.65mm, Series=10118192, Supplier 1=Digi-Key
L1 L2 L3 L4: library part INDUCTOR_12uH_0603, "12 µH Shielded Multilayer Inductor 10 mA 1.8Ohm Max 0603 (1608 Metric)", Current Rating=10mA, DC Resistance=1.8Ohm, Tolerance="+/- 5%", ComponentLink1Description=Digikey, ComponentLink1URL=https://www.digikey.com/en/products/detail/tdk-corporation/MLF1608E120JTD25/4743066, Made By="Nathan Ayer"
R1 R2 R3 R4: library part RESISTOR_1K_0603, "RES 1.45K OHM 0.1% 1/10W 0603", Digikey Part Numer=CR0603-JW-104ELFTR-ND, Tolerance="+/- 0.1%", Value  (Ohms)=1K, ComponentLink1Description=Digikey, ComponentLink1URL=https://www.digikey.com/en/products/detail/koa-speer-electronics-inc/RN73H1JTTD1451B50/10688964, Made By="Nathan Ayer", Supplier=Digikey, Wattage=1/10W
R1C R4C R4R R5R R6C: library part RESISTOR_10K_0402, "RES 10k OHM 1% 1/16W 0402", Digikey Part Numer=CR0603-JW-104ELFTR-ND, Supplier Part Number 1=YAG3436CT-ND, Tolerance="+/- 1%", Value  (Ohms)=10K, Made By="Robert Pafford", Supplier=Digikey, Supplier 1=Digi-Key, Wattage=1/16W
R1R R6R R7R R8 R12: library part RESISTOR_1K_0402, "RES 1k OHM 1% 1/16W 0402", Digikey Part Numer=CR0603-JW-104ELFTR-ND, Supplier Part Number 1=13-AC0402FR-131KLCT-ND, Tolerance="+/- 1%", Value  (Ohms)=1K, Made By="Robert Pafford", Supplier=Digikey, Supplier 1=Digi-Key, Wattage=1/16W
R2C R3C: library part RESISTOR_60.4_0402, "RES 60.4 OHM 1% 1/16W 0402", Digikey Part Numer=CR0603-JW-104ELFTR-ND, Supplier Part Number 1=13-AC0402FR-0760R4LCT-ND, Tolerance="+/- 1%", Value  (Ohms)=60.4, Made By="Robert Pafford", Supplier=Digikey, Supplier 1=Digi-Key, Wattage=1/16W
R2R R3R: library part RESISTOR_27_0402, "RES 27 OHM 1% 1/16W 0402", Digikey Part Numer=CR0603-JW-104ELFTR-ND, Supplier Part Number 1=YAG5278DKR-ND, Tolerance="+/- 1%", Value  (Ohms)=27, Made By="Robert Pafford", Supplier=Digikey, Supplier 1=Digi-Key, Wattage=1/16W
R5 R6: "20 kOhms 0.1W, 1/10W J Lead Surface Mount Trimmer Potentiometer Cermet 1 Turn Top Adjustment", Package="1608 Bourns", Check_prices=https://www.snapeda.com/parts/TC33X-2-203E/Bourns/view-part/312812/?ref=eda, Digi-Key_Part_Number=TC33X-2-203ECT-ND, MF=Bourns, MP=TC33X-2-203E, Purchase-URL=https://pricing.snapeda.com/search/part/TC33X-2-203E/?ref=eda, SnapEDA_Link=https://www.snapeda.com/parts/TC33X-2-203E/Bourns/view-part/312812/?ref=snap
R5C: library part RESISTOR_604_0402, "RES 604 OHM 1% 1/16W 0402", Digikey Part Numer=CR0603-JW-104ELFTR-ND, Supplier Part Number 1=13-AC0402FR-07604RLCT-ND, Tolerance="+/- 1%", Value  (Ohms)=604, Made By="Robert Pafford", Supplier=Digikey, Supplier 1=Digi-Key, Wattage=1/16W
R7 R11: "20 kOhms 0.1W, 1/10W J Lead Surface Mount Trimmer Potentiometer Cermet 1 Turn Top Adjustment", Package="1608 Bourns", Supplier Part Number 1=652-TC33X-2-203E, Check_prices=https://www.snapeda.com/parts/TC33X-2-203E/Bourns/view-part/312812/?ref=eda, Digi-Key_Part_Number=TC33X-2-203ECT-ND, MF=Bourns, MP=TC33X-2-203E, Purchase-URL=https://pricing.snapeda.com/search/part/TC33X-2-203E/?ref=eda, SnapEDA_Link=https://www.snapeda.com/parts/TC33X-2-203E/Bourns/view-part/312812/?ref=snap, Supplier 1=Mouser
R7C R8C: library part RESISTOR_200_0402, "RES 200 OHM 1% 1/16W 0402", Digikey Part Numer=CR0603-JW-104ELFTR-ND, Supplier Part Number 1=YAG3453CT-ND, Tolerance="+/- 1%", Value  (Ohms)=200, Made By="Robert Pafford", Supplier=Digikey, Supplier 1=Digi-Key, Wattage=1/16W
R9 R10: library part RESISTOR_10K_0.5%_0603, "RES 10k OHM 0.5% 1/10W 0603", Digikey Part Numer=CR0603-JW-104ELFTR-ND, Supplier Part Number 1=749-1695-1-ND, Tolerance="+/- 0.5%", Value  (Ohms)=10K, Made By="Robert Pafford", Supplier=Digikey, Supplier 1=Digi-Key, Wattage=1/10W
R13 R14: library part TC33X-2-203E, "20 kOhms 0.1W, 1/10W J Lead Surface Mount Trimmer Potentiometer Cermet 1 Turn Top Adjustment", Package="1608 Bourns", Check_prices=https://www.snapeda.com/parts/TC33X-2-203E/Bourns/view-part/312812/?ref=eda, Digi-Key_Part_Number=TC33X-2-203ECT-ND, MF=Bourns, MP=TC33X-2-203E, Purchase-URL=https://pricing.snapeda.com/search/part/TC33X-2-203E/?ref=eda, SnapEDA_Link=https://www.snapeda.com/parts/TC33X-2-203E/Bourns/view-part/312812/?ref=snap
SW1C: library part CAS-220TA_CAN_TERM, "GOLD SWITCH FLUSH SLIDE DPDT 100MA 6V", Current Rating="100 mA", Supplier Part Number 1=CAS220JCT-ND, Voltage Rating=6VDC, Contact Finish=Gold, Made By="Robert Pafford", Supplier 1=Digi-Key, Switch Function=DPDT
SW1R SW2R: library part "Tactile Switch SMD", "WS-TASV J-Bend SMT Tact Switch, SPST-NO, 16VDC, 50mA, 260g", Manufacturer="Wurth Elektronik", Operating Temperature Max=85°C, Operating Temperature Min=-40°C, Rated Current=50mA, Rated Voltage=16VDC, Category="Tact Switches", Circuit=SPST-NO, ComponentLink1Description="Website Link", ComponentLink1URL=https://www.we-online.com/redexpert/article/434123025826?ad, ComponentLink2Description="Datasheet Link", ComponentLink2URL=https://www.we-online.com/redexpert/spec/434123025826?ad, Contact Material="Stainless Steel", Contact Plating=Silver, Height=2.5mm, Length=4.2mm, Manufacturer Part Number=434123025826, Match Code=WS-TASV, Mount="Surface Mount", Operation Force=260g, Packaging="Tape and Reel", Terminal Material="Copper Alloy", Terminal Plating=Silver, Washable=No, Width=3.2mm
TP1 TP2 TP3 TP4 TP5 TP6 TP7 TP8 TP9 TP10 TP13 TP14 TP15 TP16 TP17 TP18 TP19 TP_ADC: library part TESTPOINT, Made By="Robert Pafford"
U1 U2 U3 U4: "IC OPAMP JFET 1 CIRCUIT 8SOIC", Manufacturer="Texas Instruments", PartNumber=LM8261M5X/NOPB, Supply Current="1.3 mA", Supply Voltage="2.5 V ~ 30 V, +/- 1.25 V ~ 15 V", ComponentLink1Description=Digi-Key, ComponentLink1URL=https://www.digikey.com/en/products/detail/texas-instruments/LF356MX-NOPB/366701, Created By="Dylan T", Gain Bandwidth Product="21 MHz"
U1C: "CANbus Controller CAN 2.0 SPI Interface 14-SOIC", Made By="Robert Pafford", Max FD Rate="8 Mbps"
U1R: "Raspberry Pi RP2040", Crystal Frequency="12 MHz", Input Voltage=3.3V, Available Busses="SPI, I2C, PWM, USB", ComponentLink1Description=DigiKey, ComponentLink2Description=Datasheet, ComponentLink2URL=https://datasheets.raspberrypi.org/rp2040/rp2040-datasheet.pdf, Made By="Robert Pafford", Number of GPIOs=29
U2C: library part TJA1442AT, "CAN Interface IC High-Speed CAN Transceiver with Standby Mode", Supplier Part Number 1=771-TJA1442AT/0Z, Made By="Robert Pafford", Max Data Rate=5Mbps, Supplier 1=Mouser
U2R: "IC FLASH 128MBIT SPI/QUAD 8SOIC", Supplier Part Number 1=W25Q128JVSIQ-ND, Made By="Robert Pafford", Size=128M, Supplier 1=Digi-Key
U5: library part CMP-0360-00164-2, "4 ns, 150 MHz Comparator with Independent Input / Output Supplies, 2 Channels, 2.7 to 12 V, 0 to +70 degC, 10-pin MSOP (MS10)", Generic Part Number=LT1715, Manufacturer="Linear Technology", Supply Current (uA) Typical=7500, Supply Voltage Range="2.7 to 12 V", Channels (#)=2, ComponentLink1Description="Manufacturer URL", ComponentLink1URL=http://www.linear.com/, ComponentLink2Description=Datasheet, ComponentLink2URL=http://cds.linear.com/docs/en/datasheet/1715fa.pdf, ComponentLink3Description="Package Specification", ComponentLink3URL=http://cds.linear.com/docs/en/packaging/MSOP_10_05-08-1661.pdf, DatasheetVersion="Rev A", Features="Comparator, Separate In/Out Power Supply", Mounting Technology="Surface Mount", PackageDescription="10-Pin MSOP, Body 3 x 3 mm, Pitch 0.5 mm", PackageReference=MS10, PartNumber=LT1715CMS#PBF, Prop Delay (us)=0.004, RoHS=Y, Vos (mV) Guaranteed=2.5, Vos (mV) Typical=0.4, Vs Max (V)=12, Vs Min (V)=2.7
U7 U8: library part CMP-1592-00007-1, "Low Cost Analog Multiplier, 20 V/us, 6 mA, 0 to 70 degC, 8-Pin SOIC (R), RoHS, Tube", PartNumber=AD633, Supply Current Max="6 mA", Temperature Max="70 degC", Temperature Min="0 degC", Code_JEDEC=MS-012-AA, ComponentLink1Description="Manufacturer URL", ComponentLink1URL=http://www.analog.com/en/index.html, ComponentLink2Description=Datasheet, ComponentLink2URL=http://www.analog.com/media/en/technical-documentation/data-sheets/AD633.pdf, ComponentLink3Description="Package Specification", ComponentLink3URL=http://www.analog.com/media/en/package-pcb-resources/package/pkg_pdf/soic_narrow-r/r_8.pdf, DatasheetVersion="Rev. K", Mounting Technology="Surface Mount", Number of Channels=2, PackageDescription="8-Pin Small Outline Package, Body 4.9 x 3.9 mm, Pitch 1.27 mm", PackageVersion=06/2006, Packing=Tube, RoHS=TRUE, Slew Rate="20 V/us"
U11: "Linear Voltage Regulator IC Positive Fixed 1 Output 1A SOT-223-3"
U12: "800-mA 15-V linear voltage regulator 4-SOT-223 -40 to 125", Package="SOT-223-4 Texas Instruments", Arrow_Electronics-Purchase-URL=https://snapeda.com/shop?store=Arrow+Electronics&id=410186, Availability=Good, DigiKey-Purchase-URL=https://snapeda.com/shop?store=DigiKey&id=410186, MF="Texas Instruments", Mouser-Purchase-URL=https://snapeda.com/shop?store=Mouser&id=410186, MP=LM1117IMPX-3.3/NOPB, Price=None, SnapEDA_Link=https://www.snapeda.com/parts/LM1117IMPX-3.3/NOPB/Texas%20Instruments/view-part/410186/?ref=snap, Texas_Instruments-Purchase-URL=https://snapeda.com/shop?store=Texas+Instruments&id=410186
U14: library part AD9837ACPZ, "Direct Digital Synthesis IC 10 b 5 MHz 28 b Tuning 10-LFCSP-WD (3x3)"
Y1: library part CMP-40224-000034-1, "XTAL OSC TCXO 25.0000MHZ HCMOS", RoHS Compliant=Yes
Y1R: library part CRYSTAL_12MHz_SMD_SMALL, "12 MHz ±20ppm Crystal 18pF 100 Ohms 4-SMD, No Lead (3.2x2.5mm)", Frequency="12 MHz", Load Capacitance=18pF, Supplier Part Number 1=2151-RH100-12.000-18-2030-EXT-TRCT-ND, ESR="100 Ohms", Made By="Robert Pafford", Supplier 1=Digi-Key

## Free pads (board coordinates)
  round 0 hole 165 unplated: 1(250,250) 1(250,3750) 1(3750,250) 1(3750,3750)

## Via types
v1: diameter 28, hole 14, Top Layer to Bottom Layer, tented both sides, 99 vias
v2: diameter 19.68, hole 7.87, Top Layer to Bottom Layer, tented both sides, 43 vias
v3: diameter 31.5, hole 15.75, Top Layer to Bottom Layer, tented both sides, 19 vias
v4: diameter 28, hole 14, Top Layer to Bottom Layer, tented top, 11 vias
v5: diameter 23.62, hole 11.81, Top Layer to Bottom Layer, tented both sides, 2 vias
v6: diameter 24, hole 10, Top Layer to Bottom Layer, tented both sides, 1 vias

## Nets (pads, with @x,y where several pads share a name; then routed paths per layer and width w, separated by ;. In a path a pad name is that pad's centre, name@x,y a point inside that pad or via, vN(x,y) a via of type N, cw(c..) or ccw(c..) an arc to the next point about the centre after c; other vN are vias at no path point)
1v1_RP2040: C11R.1 C12R.1 C13R.1 U1R.23 U1R.45 U1R.50 | length 579.4
  Top Layer w7.87: U1R.23@3187.5,2527.83 v2(3228.35,2527.83) 3229.49,2526.69 3229.49,2499.14 3251.97,2476.65 v2(3401.57,2476.65) ; U1R.45@3458.17,2480.59 3427.17,2480.59 3423.23,2476.65 v2(3401.57,2476.65) ; U1R.50@3458.17,2559.33 3411.4,2559.33 3408.71,2556.64 v2(3405.51,2556.64) 3405.51,2553.44 3399.61,2547.53 3399.61,2478.62 v2(3401.57,2476.65)
  Bottom Layer w15.75: C12R.1@3182.48,2512.09 3212.6,2512.09 v2(3228.35,2527.83) ; v2(3401.57,2476.65) C11R.1@3443.5,2476.65 ; v2(3405.51,2556.64) 3405.51,2557.7 3409.45,2561.64 C13R.1@3409.45,2593.39